# Allegro board BeagleBone_AI-64_Rev_B1_PCB_220602.brd
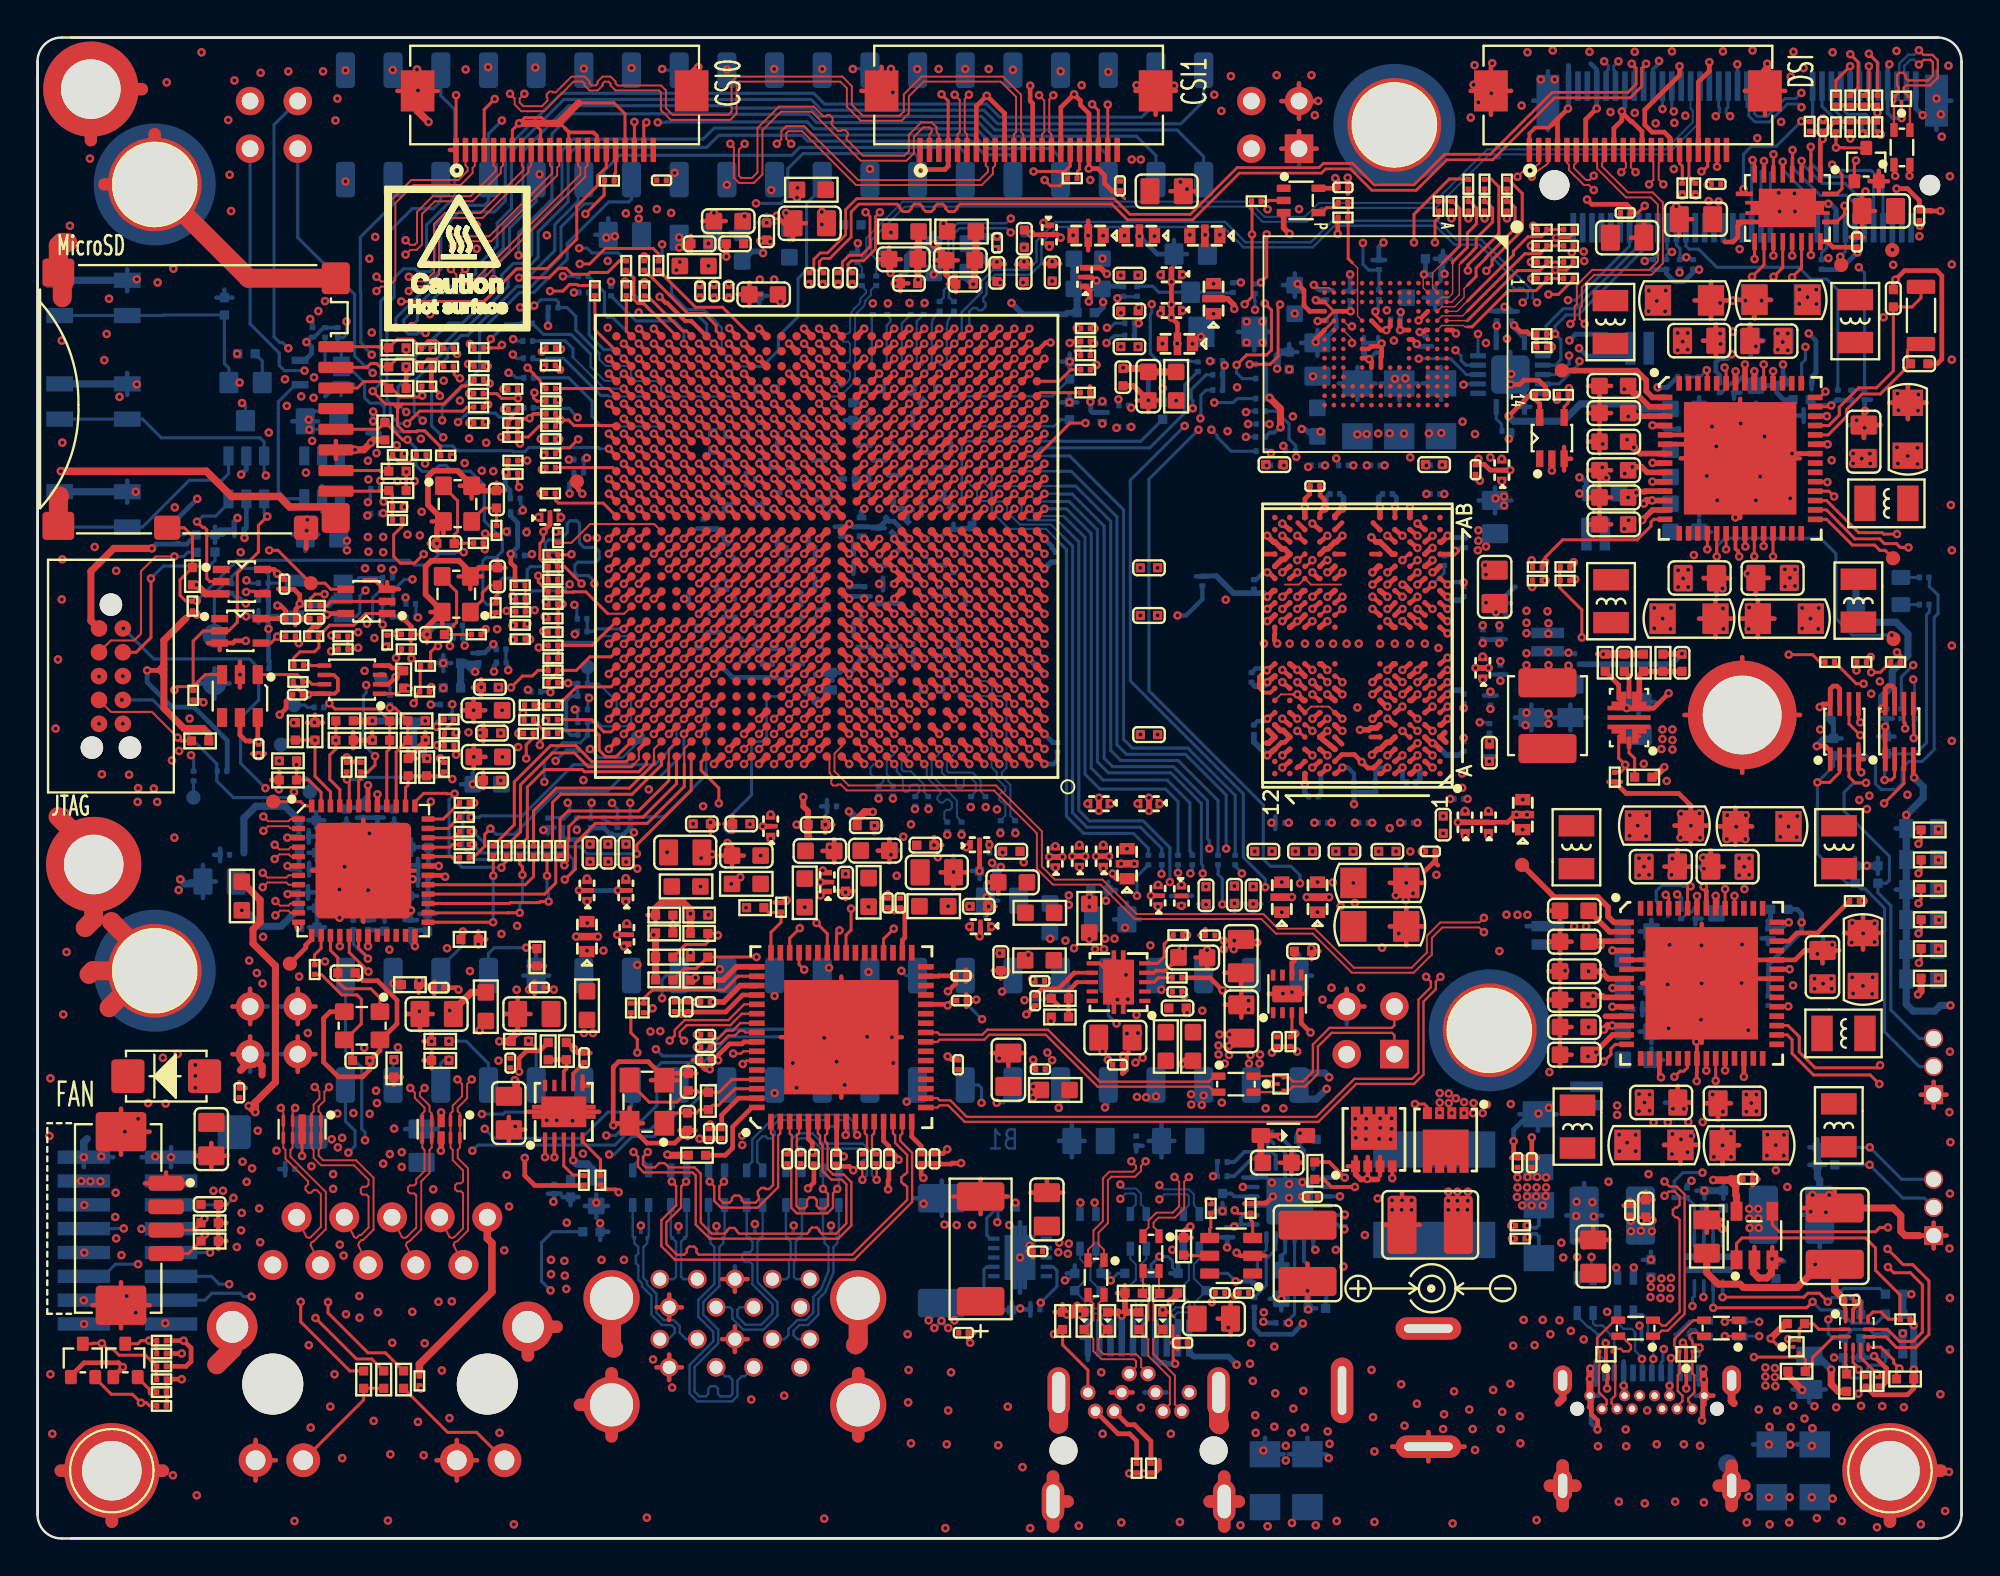
[diagram p0: board, top side]
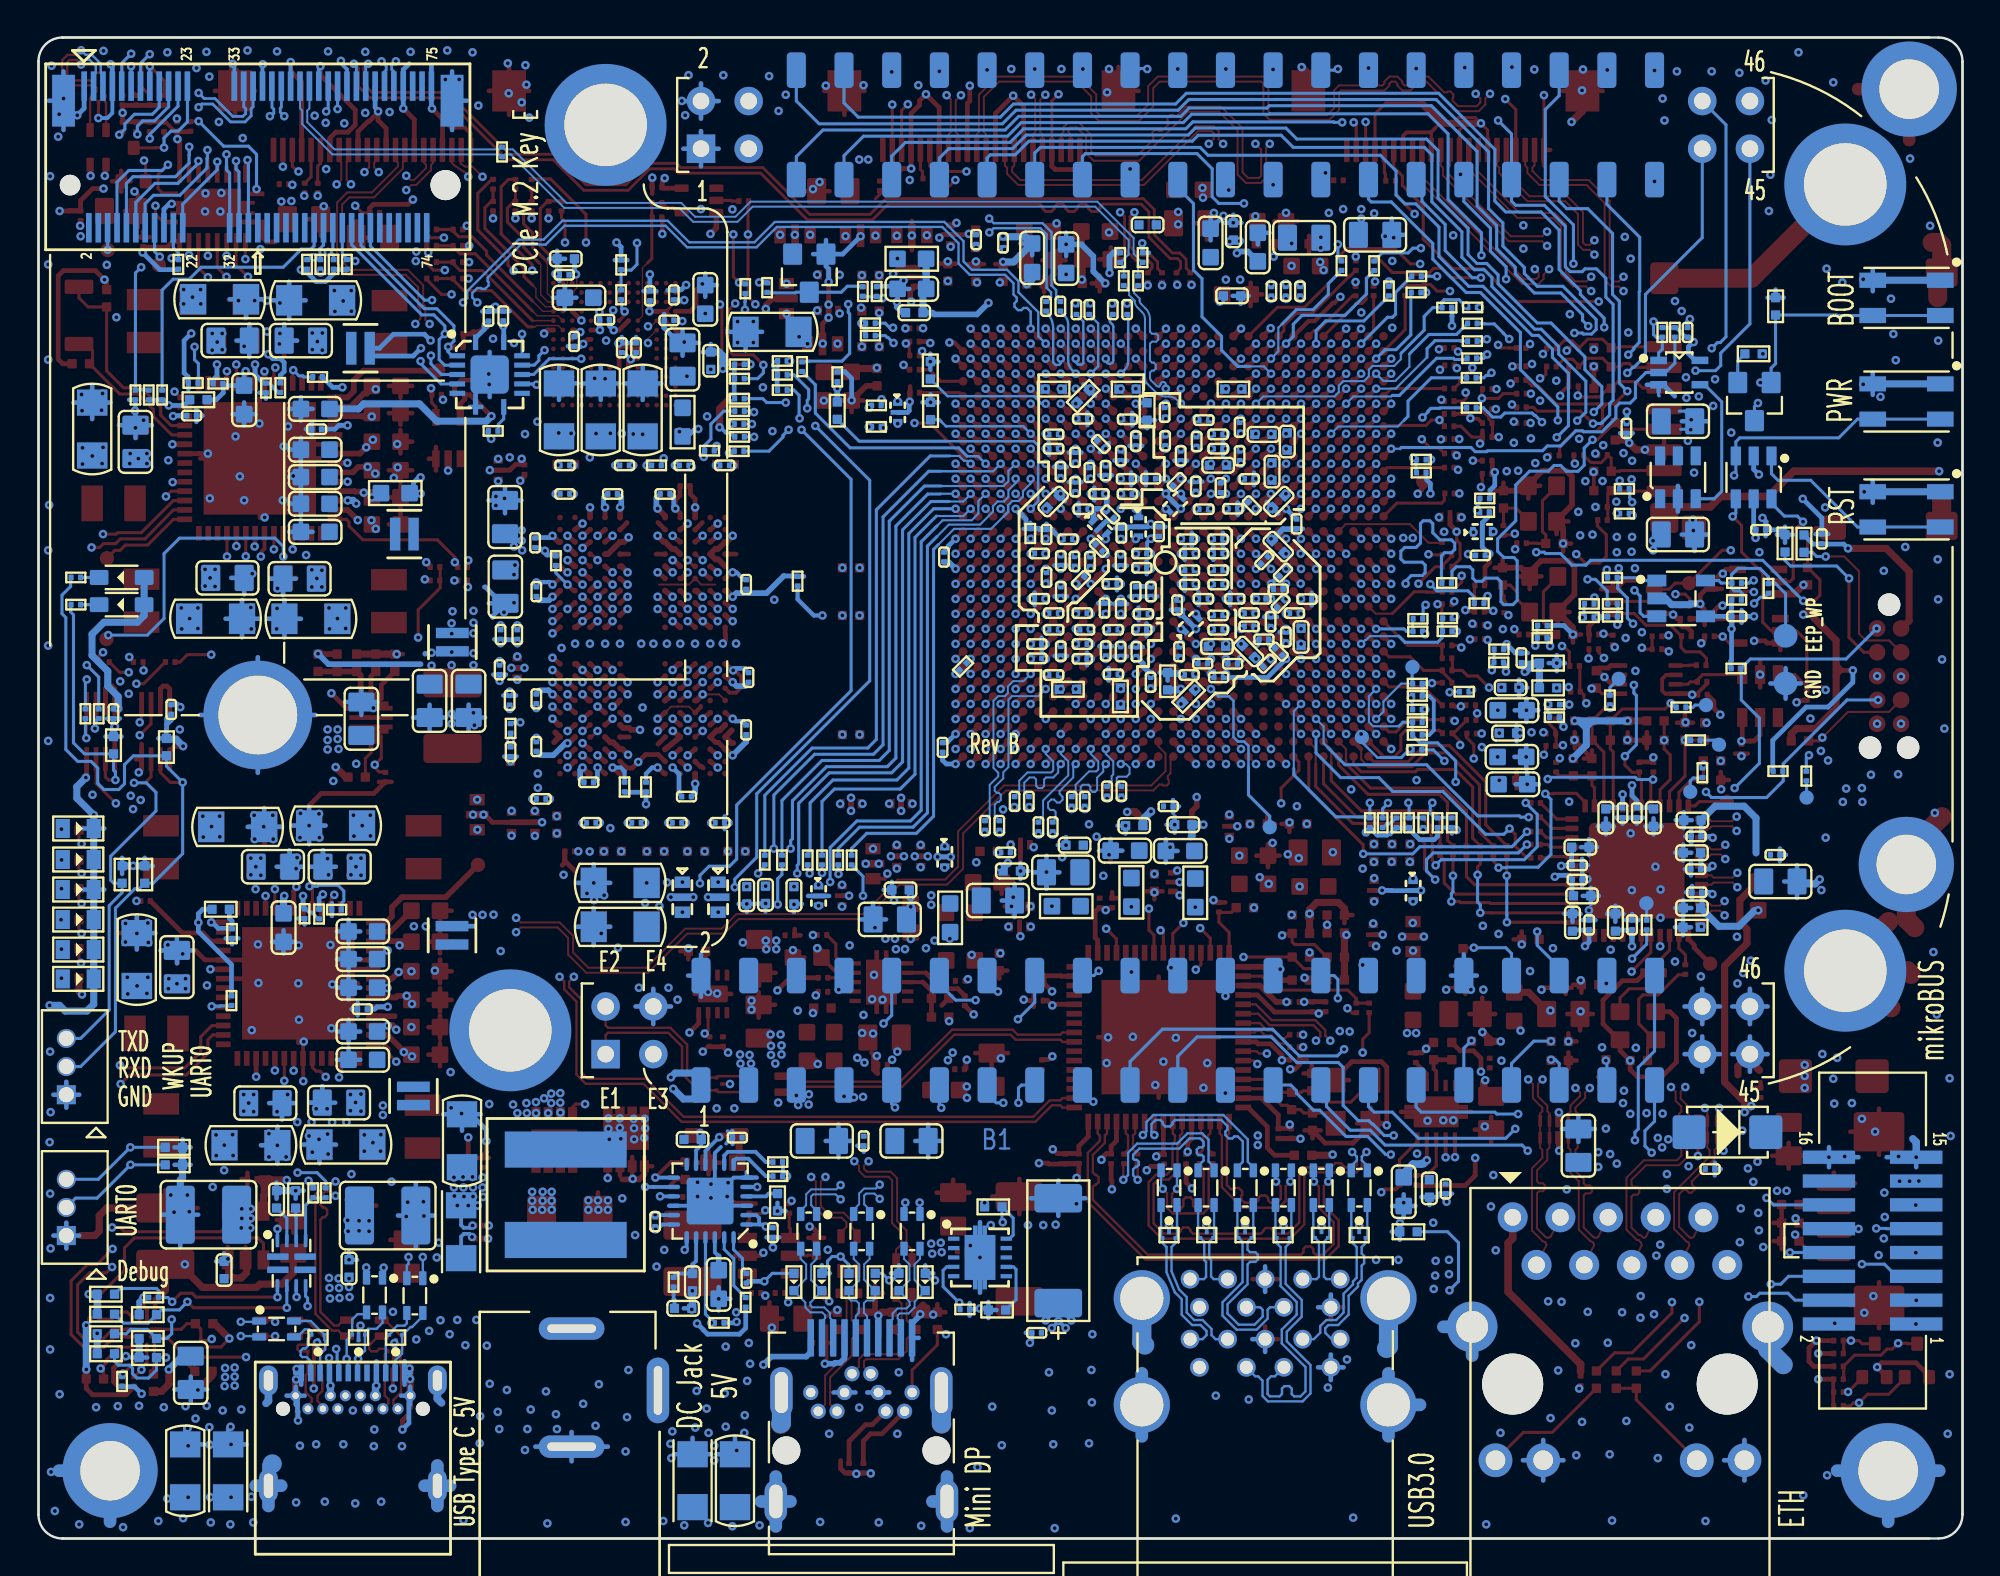
[diagram p1: board, bottom side, seen from below]

Outline 102.5 x 80 mm; copper layers: TOP, L2-GND, L3-SIGNAL, L4-GND, L5-SIGNAL, L6-GND, L7-PWR/GND, L8-PWR/GND, L9-PWR/GND, L10-SIGNAL, L11-GND, L12-SIGNAL, L13-GND, BOTTOM. Coordinates in mm from the lower left corner of the outline.
Outline path: 0,78.73 0,1.27 ; 0,78.73 arc(0.37,79.63) 1.27,80 ; 0,78.73 arc(0.37,79.63) 1.27,80 ; 0,78.73 0,1.27 ; 0,78.73 0,1.27 ; 0,1.27 arc(0.37,0.37) 1.27,0 ; 0,1.27 arc(0.37,0.37) 1.27,0 ; 1.27,80 101.23,80 ; 1.27,80 101.23,80 ; 101.23,80 1.77,80 ; 101.23,80 arc(102.12,79.63) 102.5,78.73 ; 101.23,80 arc(102.12,79.63) 102.5,78.73 ; 1.27,0 101.23,0 ; 1.27,0 101.23,0 ; 101.23,0 1.77,0 ; 101.23,0 arc(102.12,0.37) 102.5,1.27 ; 101.23,0 arc(102.12,0.37) 102.5,1.27 ; 102.5,78.73 102.5,1.27 ; 102.5,78.73 102.5,1.27 ; 102.5,78.73 102.5,1.27

## Design rules (mm)
constraint set DEFAULT: min track width 0.165
net group B_HUB_USB1_DM_DN2: nets B_USB1_DN1_D_N B_USB1_DN1_D_P
net group B_USBA2_SS_RX: nets B_USB1_SSRX_DN1_N B_USB1_SSRX_DN1_P
net group B_USBA2_SS_TX: nets B_USB1_SSTX_DN1_N B_USB1_SSTX_DN1_P
net group C_DP0_AUX: nets C_DP0_AUX_N C_DP0_AUX_P
net group C_DP0_TX0: nets C_DP0_TX0_N C_DP0_TX0_P
net group C_DP0_TX1: nets C_DP0_TX1_N C_DP0_TX1_P
net group C_DP0_TX2: nets C_DP0_TX2_N C_DP0_TX2_P
net group C_DP0_TX3: nets C_DP0_TX3_N C_DP0_TX3_P
net group C_PCIE1_TX0_N: nets C_PCIE1_TX0_N PCIE1_TX0_N
net group C_PCIE1_TX0_P: nets C_PCIE1_TX0_P PCIE1_TX0_P
net group C_PCIE1_TX1_N: nets C_PCIE1_TX1_N PCIE1_TX1_N
net group C_PCIE1_TX1_P: nets C_PCIE1_TX1_P PCIE1_TX1_P
net group C_USB1_SSTX_DN1_N: nets C_USB1_SSTX_DN1_N USB1_SSTX_DN1_N
net group C_USB1_SSTX_DN1_P: nets C_USB1_SSTX_DN1_P USB1_SSTX_DN1_P
net group C_USB1_SSTX_DN2_N: nets C_USB1_SSTX_DN2_N USB1_SSTX_DN2_N
net group C_USB1_SSTX_DN2_P: nets C_USB1_SSTX_DN2_P USB1_SSTX_DN2_P
net group C_USB_SS_TX1_N: nets C_USB_SS_TX1_N C_USB_SS_TX1_P
net group C_USB_SS_TX2: nets C_USB_SS_TX2_N C_USB_SS_TX2_P
net group C_USBA1_SS_TX: nets C_USBA_SS_TX_N C_USBA_SS_TX_P
net group C_USBA_SSRX_UP_N: nets C_USBA_SSRX_UP_N USBA_SS_RX_N
net group C_USBA_SSRX_UP_P: nets C_USBA_SSRX_UP_P USBA_SS_RX_P
net group CSI0_RX2: nets CSI0_RX2_N CSI0_RX2_P
net group CSI0_RX3: nets CSI0_RX3_N CSI0_RX3_P
net group DP0_AUX: nets DP0_AUX_N DP0_AUX_P
net group DP0_TX0: nets DP0_TX0_N DP0_TX0_P
net group DP0_TX1: nets DP0_TX1_N DP0_TX1_P
net group DP0_TX2: nets DP0_TX2_N DP0_TX2_P
net group DP0_TX3: nets DP0_TX3_N DP0_TX3_P
net group DP_CON_DP0_AUX: nets CON_DP0_AUX_N CON_DP0_AUX_P
net group DP_CON_DP0_TX0: nets CON_DP0_TX0_N CON_DP0_TX0_P
net group DP_CON_DP0_TX1: nets CON_DP0_TX1_N CON_DP0_TX1_P
net group DP_CON_DP0_TX2: nets CON_DP0_TX2_N CON_DP0_TX2_P
net group DP_CON_DP0_TX3: nets CON_DP0_TX3_N CON_DP0_TX3_P
net group EMMC_CLK: nets EMMC_CLK MMC0_CLK
net group EMMC_CMD: nets EMMC_CMD MMC0_CMD
net group EMMC_DAT0: nets EMMC_DAT0 MMC0_DAT0
net group EMMC_DAT1: nets EMMC_DAT1 MMC0_DAT1
net group EMMC_DAT2: nets EMMC_DAT2 MMC0_DAT2
net group EMMC_DAT3: nets EMMC_DAT3 MMC0_DAT3
net group EMMC_DAT4: nets EMMC_DAT4 MMC0_DAT4
net group EMMC_DAT5: nets EMMC_DAT5 MMC0_DAT5
net group EMMC_DAT6: nets EMMC_DAT6 MMC0_DAT6
net group EMMC_DAT7: nets EMMC_DAT7 MMC0_DAT7
net group EXP_HUB_USB1_DM_DN4: nets EXP_USB1_DN4_D_N EXP_USB1_DN4_D_P
net group M2_HUB_USB1_DP_DN3: nets M2_USB1_DN3_D_N M2_USB1_DN3_D_P
net group MCU_RGMII_RD0: nets MCU_RGMII_RD0 RX_D0
net group MCU_RGMII_RD1: nets MCU_RGMII_RD1 RX_D1
net group MCU_RGMII_RD2: nets MCU_RGMII_RD2 RX_D2
net group MCU_RGMII_RD3: nets MCU_RGMII_RD3 RX_D3
net group MCU_RGMII_RX_CTL: nets MCU_RGMII_RX_CTL RX_CTRL
net group MCU_RGMII_RXC: nets MCU_RGMII_RXC RX_CLK
net group MMC1_CLK: nets MMC1_CLK SD_CLK
net group MMC1_DAT0: nets MMC1_DAT0 SD_DAT0
net group MMC1_DAT1: nets MMC1_DAT1 SD_DAT1
net group MMC1_DAT2: nets MMC1_DAT2 SD_DAT2
net group MMC1_DAT3: nets MMC1_DAT3 SD_DAT3
net group MMC2_CLK: nets MMC2_CLK MMC2_CLK_R
net group PCIE1_REFCLK: nets PCIE1_REFCLK_N PCIE1_REFCLK_P
net group PCIE1_RX0: nets PCIE1_RX0_N PCIE1_RX0_P
net group PCIE1_RX1: nets PCIE1_RX1_N PCIE1_RX1_P
net group PHY_CLK_OUT_TP: nets PHY_CLK_OUT PHY_CLK_OUT_TP
net group PHY_GPIO0_TP: nets PHY_GPIO0 PHY_GPIO0_TP
net group PHY_GPIO1_TP: nets PHY_GPIO1 PHY_GPIO1_TP
net group PHY_LED0_TP: nets PHY_LED0 PHY_LED0_TP
net group PHY_LED1_TP: nets PHY_LED1 PHY_LED1_TP
net group PHY_LED2_TP: nets PHY_LED2 PHY_LED2_TP
net group PHY_TD_A: nets PHY_TD_A_M PHY_TD_A_P
net group PHY_TD_B: nets PHY_TD_B_M PHY_TD_B_P
net group PHY_TD_C: nets PHY_TD_C_M PHY_TD_C_P
net group PHY_TD_D: nets PHY_TD_D_M PHY_TD_D_P
net group SOC_SERDES1_REFCLK: nets SOC_SERDES1_REFCLK_N SOC_SERDES1_REFCLK_P
net group T_HUB_USB1_DM_DN1: nets T_USB1_DN2_D_N T_USB1_DN2_D_P
net group T_USBA1_SS_RX: nets T_USB1_SSRX_DN2_N T_USB1_SSRX_DN2_P
net group T_USBA1_SS_TX: nets T_USB1_SSTX_DN2_N T_USB1_SSTX_DN2_P
net group TX_CLK: nets MCU_RGMII_TXC TX_CLK
net group TX_CTRL: nets MCU_RGMII_TX_CTL TX_CTRL
net group TX_D0: nets MCU_RGMII_TD0 TX_D0
net group TX_D1: nets MCU_RGMII_TD1 TX_D1
net group TX_D2: nets MCU_RGMII_TD2 TX_D2
net group TX_D3: nets MCU_RGMII_TD3 TX_D3
net group USB0_DATA: nets USB0_DATA_N USB0_DATA_P
net group USB1_DN1_D_P: nets USB1_DN1_D_N USB1_DN1_D_P
net group USB1_DN2_D_N: nets USB1_DN2_D_N USB1_DN2_D_P
net group USB1_DN3_D_N: nets USB1_DN3_D_N USB1_DN3_D_P
net group USB1_DN4_D_N: nets USB1_DN4_D_N USB1_DN4_D_P
net group USB1_HUB_D: nets USB1_HUB_D_N USB1_HUB_D_P
net group USB1_SSRX_DN1_P: nets USB1_SSRX_DN1_N USB1_SSRX_DN1_P
net group USB1_SSRX_DN2_P: nets USB1_SSRX_DN2_N USB1_SSRX_DN2_P
net group USBA_SS_TX_P: nets USBA_SS_TX_N USBA_SS_TX_P
net group USBC_DATA_CONN_P: nets USBC_DATA_CONN_N USBC_DATA_CONN_P
net group USBC_SS_RX1_CONN_N: nets USBC_SS_RX1_CONN_N USBC_SS_RX1_CONN_P
net group USBC_SS_RX1_N: nets USBC_SS_RX1_N USBC_SS_RX1_P
net group USBC_SS_RX2: nets USBC_SS_RX2_N USBC_SS_RX2_P
net group USBC_SS_RX2_CONN_N: nets USBC_SS_RX2_CONN_N USBC_SS_RX2_CONN_P
net group USBC_SS_TX1_CONN_P: nets USBC_SS_TX1_CONN_N USBC_SS_TX1_CONN_P
net group USBC_SS_TX1_N: nets USBC_SS_TX1_N USBC_SS_TX1_P
net group USBC_SS_TX2: nets USBC_SS_TX2_N USBC_SS_TX2_P
net group USBC_SS_TX2_CONN_P: nets USBC_SS_TX2_CONN_N USBC_SS_TX2_CONN_P
net group CSI0_RX(SOC-MUX): nets CSI0_RX0_N CSI0_RX0_P CSI0_RX1_N CSI0_RX1_P CSI0_RXCLK_N CSI0_RXCLK_P
net group CSI1_RX: nets CSI1_RX0_N CSI1_RX0_P CSI1_RX1_N CSI1_RX1_P CSI1_RX2_N CSI1_RX2_P CSI1_RX3_N CSI1_RX3_P CSI1_RXCLK_N CSI1_RXCLK_P
net group DDR_ADD: nets LPDDR4_CA2 LPDDR4_CA3 LPDDR4_CA4 LPDDR4_CA5 LPDDR4_CK_T LPDDR4_CKE1 LPDDR4_CSN0_0 LPDDR4_CSN0_1 LPDDR4_CSN1_0 LPDDR4_CSN1_1
net group DDR_DATA0: nets LPDDR4_DM0_DBI0# LPDDR4_DQ0 LPDDR4_DQ1 LPDDR4_DQ2 LPDDR4_DQ3 LPDDR4_DQ4 LPDDR4_DQ5 LPDDR4_DQ6 LPDDR4_DQ7 LPDDR4_DQS0_N LPDDR4_DQS0_P
net group DDR_DATA1: nets LPDDR4_DM1_DBI1# LPDDR4_DQ8 LPDDR4_DQ9 LPDDR4_DQ10 LPDDR4_DQ11 LPDDR4_DQ12 LPDDR4_DQ13 LPDDR4_DQ14 LPDDR4_DQ15 LPDDR4_DQS1_N LPDDR4_DQS1_P
net group DDR_DATA2: nets LPDDR4_DM2_DBI2# LPDDR4_DQ16 LPDDR4_DQ17 LPDDR4_DQ18 LPDDR4_DQ19 LPDDR4_DQ20 LPDDR4_DQ21 LPDDR4_DQ22 LPDDR4_DQ23 LPDDR4_DQS2_N LPDDR4_DQS2_P
net group DDR_DATA3: nets LPDDR4_DM3_DBI3# LPDDR4_DQ24 LPDDR4_DQ25 LPDDR4_DQ26 LPDDR4_DQ27 LPDDR4_DQ28 LPDDR4_DQ29 LPDDR4_DQ30 LPDDR4_DQ31 LPDDR4_DQS3_N LPDDR4_DQS3_P
net group DSI_TX: nets DSI_TX0_N DSI_TX0_P DSI_TX1_N DSI_TX1_P DSI_TX2_N DSI_TX2_P DSI_TX3_N DSI_TX3_P DSI_TXCLK_N DSI_TXCLK_P
net group MG1_LCD: nets Y25_SYS_BOOTMODE3

## Placement (name value [footprint] x y rotation side)
C1  47uF  [C1206]  99.63 59.14 90 bottom
C2  10uF  [C0805]  97.33 58.45 90 bottom
C3  47uF  [C1206]  97.26 30.86 90 bottom
C4  100nF  [C0201]  33.93 28.34 90 top
C5  10uF  [C0805]  95.12 30.46 90 bottom
C6  1nF  [C1206]  94.68 3.6 90 bottom
C7  100nF  [C0201]  94.34 59.85 180 bottom
C8  100uF  [C1210]  93.44 17.26 0 bottom
C9  47uF  [C1206]  93.06 49.02 180 bottom
C10  47uF  [C1206]  92.84 66.06 180 bottom
C11  100nF  [C0402]  92.61 14.31 90 bottom
C12  10uF  [C0805]  92.43 51.2 180 bottom
C13  10uF  [C0805]  92.16 63.85 180 bottom
C14  47uF  [C1206]  91.89 37.93 180 bottom
C15  2.2uF  [C0603]  91.54 60.69 270 bottom
C16  47uF  [C1206]  91.18 20.96 180 bottom
C17  10uF  [C0805]  90.41 23.21 180 bottom
C18  10uF  [C0805]  90 35.81 180 bottom
C19  1uF  [C0402]  89.81 18.08 90 bottom
C20  2.2uF  [C0603]  89.44 32.56 270 bottom
C21  10uF  [C0805]  94.38 8.83 270 bottom
C22  10uF  [C0805]  88.59 51.16 0 bottom
C23  10uF  [C0805]  88.52 63.85 0 bottom
C24  47uF  [C1206]  87.98 49.02 0 bottom
C25  2.2uF  [C0603]  87.76 60.21 0 bottom
C26  2.2uF  [C0603]  87.76 58.03 0 bottom
C27  2.2uF  [C0603]  87.76 56.57 0 bottom
C28  2.2uF  [C0603]  87.76 55.15 0 bottom
C29  2.2uF  [C0603]  87.76 53.65 0 bottom
C30  47uF  [C1206]  87.73 66 0 bottom
C31  100nF  [C0201]  87.68 59.13 0 bottom
C32  47uF  [C1206]  86.67 38 0 bottom
C33  10uF  [C0805]  86.49 23.23 0 bottom
C34  10uF  [C0805]  86.45 35.81 0 bottom
C35  47uF  [C1206]  86.12 21 0 bottom
C36  100nF  [C0402]  85.95 14.39 90 bottom
C37  22uF  [C0805]  85.29 43.69 90 bottom
C38  100nF  [C0201]  85.24 28.22 0 bottom
C39  2.2uF  [C0603]  85.22 32.36 0 bottom
C40  2.2uF  [C0603]  85.22 30.88 0 bottom
C41  2.2uF  [C0603]  85.22 29.36 0 bottom
C42  2.2uF  [C0603]  85.22 27.02 0 bottom
C43  2.2uF  [C0603]  85.22 25.52 0 bottom
C44  100uF  [C1210]  83.89 17.21 180 bottom
C45  22uF  [C0805]  81.66 44.65 270 bottom
C46  47uF  [C1206]  79.93 21.2 90 bottom
C47  22uF  [C0805]  79.58 44.65 270 bottom
C48  100nF  [C0201]  78.52 65.15 90 bottom
C49  10nF  [C0201]  77.93 46.3 270 bottom
C50  10nF  [C0201]  77.88 48.18 270 bottom
C51  100nF  [C0201]  77.73 65.16 270 bottom
C52  10uF  [C0805]  77.64 54.44 90 bottom
C53  10uF  [C0805]  77.62 50.73 270 bottom
C54  100nF  [C0201]  77.4 44.68 90 bottom
C55  10nF  [C0201]  77.35 41.93 270 bottom
C56  10nF  [C0201]  76.99 48.18 270 bottom
C57  10nF  [C0201]  76.04 53.07 90 bottom
C58  10nF  [C0201]  75.97 50.47 270 bottom
C59  10nF  [C0201]  75.97 44.75 90 bottom
C60  10nF  [C0201]  75.97 42.21 270 bottom
C61  10nF  [C0201]  75.72 39.42 180 bottom
C62  47uF  [C1206]  74.76 60.16 90 bottom
C63  100nF  [C0201]  74.49 67.36 0 bottom
C64  100nF  [C0201]  74.45 57.2 180 bottom
C65  10nF  [C0201]  74.45 55.67 180 bottom
C66  1uF  [C0402]  74.4 68.21 0 bottom
C67  100nF  [C0201]  73.96 63.8 270 bottom
C68  2.2uF  [C0603]  73.7 66.14 0 bottom
C69  10nF  [C0201]  73.18 40.31 0 bottom
C70  10nF  [C0201]  73.05 38.15 180 bottom
C71  47uF  [C1206]  72.54 60.15 90 bottom
C72  100nF  [C0201]  72.34 64.96 180 bottom
C73  10nF  [C0201]  71.91 55.67 180 bottom
C74  47uF  [C1206]  71.51 34.95 0 bottom
C75  47uF  [C1206]  71.51 32.6 0 bottom
C76  100nF  [C0201]  71.42 63.47 90 bottom
C77  10nF  [C0201]  71.27 57.2 180 bottom
C78  100nF  [C0201]  70.66 63.47 90 bottom
C79  10nF  [C0201]  70.64 38.15 180 bottom
C80  47uF  [C1206]  70.31 60.15 90 bottom
C81  100nF  [C0201]  69.92 66.23 90 bottom
C82  10nF  [C0201]  69.12 55.67 0 bottom
C83  100nF  [C0201]  68.91 64.93 0 bottom
C84  100nF  [C0201]  68.65 66.28 90 bottom
C85  10nF  [C0201]  68.48 38.15 180 bottom
C86  10uF  [EMIFIL_0603_3P]  68.2 34.18 270 bottom
C87  22uF  [C0805]  68.18 62.84 90 bottom
C88  0.015uF  [C0402]  68.15 12.27 180 bottom
C89  10nF  [C0201]  68.1 57.2 180 bottom
C90  10nF  [C0201]  67.97 39.55 180 bottom
C91  330pF  [C0402]  67.66 13.66 270 bottom
C92  100nF  [C0402]  67.65 21.27 0 bottom
C93  2.2uF  [C0603]  66.97 66.04 90 bottom
C94  1uF  [C0402]  66.68 62.77 90 bottom
C95  10uF  [EMIFIL_0603_3P]  66.29 34.18 270 bottom
C96  120nF  [C0603]  66.26 13.54 270 bottom
C97  10nF  [C0201]  66.19 38.15 180 bottom
C98  10nF  [C0201]  65.94 57.2 180 bottom
C99  10nF  [C0201]  64.8 50.85 270 bottom
C100  10nF  [C0201]  64.8 43.1 270 bottom
C101  220nF  [C0201]  64.78 13.87 270 bottom
C102  470nF  [C0402]  64.77 34.28 270 bottom
C103  10nF  [C0201]  64.67 45.9 270 bottom
C104  470nF  [C0402]  63.77 34.31 270 bottom
C105  47uF  [C1206]  63.41 64.31 0 bottom
C106  100nF  [C0201]  63.37 16.31 90 bottom
C107  470nF  [C0402]  62.25 34.28 270 bottom
C108  1uF  [EMIFIL_0402_3P]  60.94 34.25 270 bottom
C109  22uF  [C0805]  57.14 33 0 bottom
C110  1uF  [EMIFIL_0402_3P]  56.72 60.02 270 bottom
C111  100nF  [C0201]  42.31 39.02 180 bottom
C112  1uF  [C0402]  56.57 34.57 0 bottom
C113  4.7uF  [C0603]  55.97 66.6 0 bottom
C114  1uF  [C0402]  55.84 65.33 0 bottom
C115  100nF  [C0201]  54.33 42.16 90 bottom
C116  100nF  [C0201]  54.26 52.31 270 bottom
C117  1uF  [EMIFIL_0402_3P]  54.22 36.33 270 bottom
C118  100nF  [C0201]  52.55 69.23 90 bottom
C119  220nF  [C0201]  52.07 38 270 bottom
C120  22uF  [C0805]  51.38 34 180 bottom
C121  220nF  [C0201]  51.31 38 270 bottom
C122  100nF  [C0201]  51.11 69.06 90 bottom
C123  100nF  [C0201]  50.98 36.57 0 bottom
C124  1uF  [C0402]  50.65 35.58 180 bottom
C125  220nF  [C0201]  50.5 39.29 270 bottom
C126  220nF  [C0201]  49.73 39.29 270 bottom
C127  100nF  [C0201]  49.3 47.67 180 bottom
C128  100nF  [C0201]  49.3 46.91 0 bottom
C129  220nF  [C0201]  49.23 37.93 270 bottom
C130  100nF  [C0201]  49.18 52.5 180 bottom
C131  100nF  [C0201]  49.18 50.09 0 bottom
C132  220nF  [C0201]  48.82 65.68 90 bottom
C133  100nF  [C0201]  48.8 53.52 90 bottom
C134  100nF  [C0201]  48.8 51.23 270 bottom
C135  220nF  [C0201]  48.46 37.93 270 bottom
C136  1uF  [C0402]  48.44 55.27 135 bottom
C137  100nF  [C0201]  48.41 58.85 180 bottom
C138  100nF  [C0201]  48.41 58.09 0 bottom
C139  100nF  [C0201]  48.41 49.32 0 bottom
C140  100nF  [C0201]  48.41 48.44 180 bottom
C141  100nF  [C0201]  48.41 46.02 0 bottom
C142  150uF  [AVX_C]  48.17 15.34 90 bottom
C143  220nF  [C0201]  48.06 65.68 90 bottom
C144  100nF  [C0201]  48.05 56.86 90 bottom
C145  100nF  [C0201]  48.03 52.12 270 bottom
C146  100nF  [C0201]  48.03 50.47 270 bottom
C147  100nF  [C0201]  48.03 47.29 270 bottom
C148  22uF  [C0805]  47.91 35.51 0 bottom
C149  4.7uF  [C0603]  47.75 68.22 90 bottom
C150  100nF  [C0201]  47.65 53.26 0 bottom
C151  220nF  [C0201]  47.45 39.29 270 bottom
C152  100nF  [C0201]  47.31 52.08 90 bottom
C153  1uF  [C0402]  47.3 36.95 0 bottom
C154  100nF  [C0201]  47.27 57.63 90 bottom
C155  100nF  [C0201]  47.27 56.06 90 bottom
C156  100nF  [C0201]  46.96 51.08 135 bottom
C157  100nF  [C0201]  49.32 10.96 0 bottom
C158  100nF  [C0201]  46.89 49.32 0 bottom
C159  100nF  [C0201]  46.89 47.67 0 bottom
C160  100nF  [C0201]  46.89 46.89 180 bottom
C161  100nF  [C0201]  46.87 59.68 180 bottom
C162  100nF  [C0201]  46.84 54.86 0 bottom
C163  100nF  [C0201]  46.76 48.44 180 bottom
C164  220nF  [C0201]  46.76 39.29 270 bottom
C165  100nF  [C0201]  46.51 56.82 90 bottom
C166  100nF  [C0201]  46.48 52.07 270 bottom
C167  100nF  [C0201]  46 55.67 0 bottom
C168  100nF  [C0201]  46 52.8 45 bottom
C169  1uF  [EMIFIL_0402_3P]  45.95 53.9 225 bottom
C170  100nF  [C0201]  45.9 58.33 225 bottom
C171  100nF  [C0201]  45.71 49.59 90 bottom
C172  100nF  [C0201]  45.65 56.92 270 bottom
C173  100nF  [C0201]  45.64 47.3 90 bottom
C174  220nF  [C0201]  45.57 39.83 270 bottom
C175  100nF  [C0201]  45.39 54.58 225 bottom
C176  100nF  [C0201]  45.29 50.88 180 bottom
C177  220nF  [C0201]  45.26 65.5 90 bottom
C178  100nF  [C0201]  45.24 48.44 180 bottom
C179  100nF  [C0201]  45.23 46.06 0 bottom
C180  100nF  [C0201]  44.85 52.11 270 bottom
C181  100nF  [C0201]  44.85 47.28 270 bottom
C182  100nF  [C0201]  44.84 49.56 90 bottom
C183  100nF  [C0201]  44.84 57.71 270 bottom
C184  100nF  [C0201]  44.81 53.59 90 bottom
C185  220nF  [C0201]  44.81 39.83 270 bottom
C186  4.7uF  [C0603]  44.62 36.66 0 bottom
C187  100nF  [C0201]  44.54 56.48 180 bottom
C188  220nF  [C0201]  44.5 65.5 90 bottom
C189  100nF  [C0201]  44.49 55.67 0 bottom
C190  100nF  [C0201]  44.48 59.65 180 bottom
C191  1uF  [C0402]  44.12 38 0 bottom
C192  100nF  [C0201]  44.05 50.47 270 bottom
C193  100nF  [C0201]  44.04 58.49 270 bottom
C194  100nF  [C0201]  44.01 47.27 90 bottom
C195  1uF  [EMIFIL_0402_3P]  43.89 53.92 270 bottom
C196  100nF  [C0201]  43.72 52.5 0 bottom
C197  100nF  [C0201]  43.72 51.74 180 bottom
C198  100nF  [C0201]  43.72 48.44 180 bottom
C199  100nF  [C0201]  43.64 49.28 0 bottom
C200  1uF  [C0402]  43.41 70.02 0 bottom
C201  100nF  [C0201]  43.25 45.64 270 bottom
C202  100nF  [C0201]  43.25 56.49 0 bottom
C203  100nF  [C0201]  43.23 50.47 270 bottom
C204  100nF  [C0201]  42.8 53.67 90 bottom
C205  100nF  [C0201]  42.5 60.03 90 bottom
C206  100nF  [C0201]  42.48 58.51 270 bottom
C207  1uF  [EMIFIL_0402_3P]  41.94 55.14 135 bottom
C208  100nF  [C0201]  41.86 56.31 315 bottom
C209  100nF  [C0201]  41.84 49.76 270 bottom
C210  100nF  [C0201]  41.73 47.27 90 bottom
C211  4.7uF  [C0603]  41.68 36.65 0 bottom
C212  100nF  [C0201]  41.65 57.7 270 bottom
C213  1uF  [C0402]  41.51 38.05 0 bottom
C214  100nF  [C0201]  41.3 53.26 180 bottom
C215  100nF  [C0201]  41.2 46.03 0 bottom
C216  100nF  [C0201]  41.18 52.5 0 bottom
C217  100nF  [C0201]  41.18 51.61 180 bottom
C218  100nF  [C0201]  41.18 50.85 0 bottom
C219  1uF  [EMIFIL_0402_3P]  41.1 48.74 135 bottom
C220  100nF  [C0201]  40.84 56.08 90 bottom
C221  100nF  [C0201]  40.79 58.47 270 bottom
C222  100nF  [C0201]  40.48 46.63 0 bottom
C223  100nF  [C0201]  40.44 50.09 0 bottom
C224  100nF  [C0201]  40.41 59.61 0 bottom
C225  100nF  [C0201]  40.41 54.86 180 bottom
C226  4.7uF  [C0603]  40.05 69.05 90 bottom
C227  1uF  [C0402]  39.72 47.55 0 bottom
C228  100nF  [C0201]  39.65 58.85 0 bottom
C229  100nF  [C0201]  39.65 58.09 180 bottom
C230  1uF  [C0402]  39.65 57.2 0 bottom
C231  100nF  [C0201]  39.65 53.26 180 bottom
C232  100nF  [C0201]  39.65 52.5 0 bottom
C233  100nF  [C0201]  39.65 51.61 180 bottom
C234  100nF  [C0201]  39.65 50.85 0 bottom
C235  100nF  [C0201]  39.65 49.2 0 bottom
C236  100nF  [C0201]  39.65 48.44 180 bottom
C237  100nF  [C0201]  39.63 45.9 0 bottom
C238  4.7uF  [C0603]  49.56 68.26 90 bottom
C239  100nF  [C0201]  39.52 56 270 bottom
C240  1uF  [C0402]  38.91 66.23 180 bottom
C241  100nF  [C0201]  38.88 46.62 0 bottom
C242  100nF  [C0201]  38.86 54.89 180 bottom
C243  1uF  [C0402]  38.84 69.67 90 bottom
C244  100nF  [C0201]  38.76 50.09 0 bottom
C245  100nF  [C0201]  38.51 59.23 270 bottom
C246  100nF  [C0201]  38.51 57.71 270 bottom
C247  100nF  [C0201]  36.45 21.58 270 top
C248  1uF  [C0402]  38.03 47.28 225 bottom
C249  100nF  [C0201]  38 48.62 180 bottom
C250  1uF  [EMIFIL_0402_3P]  29.27 34.53 270 bottom
C251  100nF  [C0201]  38 49.32 0 bottom
C252  100nF  [C0201]  38 56.47 180 bottom
C253  100nF  [C0201]  37.85 55.06 45 bottom
C254  4.7uF  [C0603]  37.54 68.83 90 bottom
C255  100nF  [C0201]  37.37 50.09 0 bottom
C256  1uF  [C0402]  37.24 58.85 0 bottom
C257  100nF  [C0201]  37.21 47.93 180 bottom
C258  100nF  [C0201]  37.19 52.14 315 bottom
C259  100nF  [C0201]  37.06 46.63 315 bottom
C260  100nF  [C0201]  36.86 48.87 90 bottom
C261  100nF  [C0201]  36.82 66.48 90 bottom
C262  1uF  [C0402]  36.78 56.87 90 bottom
C263  1uF  [C0402]  36.45 52.87 45 bottom
C264  100nF  [C0201]  36.45 50.59 0 bottom
C265  100nF  [C0201]  36.43 47.27 45 bottom
C266  1uF  [C0402]  36.43 55.27 315 bottom
C267  100nF  [C0201]  36.32 49.83 315 bottom
C268  100nF  [C0201]  36.2 51.48 315 bottom
C269  100nF  [C0201]  36.05 66.48 90 bottom
C270  100nF  [C0201]  36.04 48.05 90 bottom
C271  1uF  [C0402]  35.97 58.47 90 bottom
C272  100nF  [C0201]  35.59 49.32 180 bottom
C273  100nF  [C0201]  35.47 54.08 270 bottom
C274  100nF  [C0201]  35.29 66.48 90 bottom
C275  1uF  [C0402]  35.23 48.05 270 bottom
C276  22uF  [C0805]  35.07 69.33 180 bottom
C277  100nF  [C0201]  34.92 50.07 180 bottom
C278  10uF  [C0805]  31.29 69.49 180 bottom
C279  100nF  [C0201]  25.68 52.4 180 bottom
C280  1uF  [EMIFIL_0402_3P]  25.58 53.67 180 bottom
C281  1uF  [C0402]  24.21 42.93 180 bottom
C282  1uF  [C0402]  24.07 45.34 180 bottom
C283  4.7uF  [C0603]  24 41.66 180 bottom
C284  4.7uF  [C0603]  23.99 44.15 180 bottom
C285  4.7uF  [C0603]  23.95 40.2 180 bottom
C286  100nF  [C0201]  23.5 46.94 90 bottom
C287  1uF  [C0402]  20.78 32.83 90 bottom
C288  100nF  [C0201]  20.52 35.88 180 bottom
C289  100nF  [C0201]  20.52 35.12 180 bottom
C290  1uF  [C0402]  20.36 36.85 180 bottom
C291  1uF  [C0402]  20.26 34.25 180 bottom
C292  100nF  [C0201]  19.89 32.71 90 bottom
C293  1uF  [C0402]  19 38.42 270 bottom
C294  1uF  [C0402]  18.49 32.83 90 bottom
C295  100nF  [C0201]  18.11 38.68 270 bottom
C296  100nF  [C0201]  17.9 59.17 270 bottom
C297  100nF  [C0201]  17.6 32.71 90 bottom
C298  100nF  [C0201]  17.35 38.68 270 bottom
C299  1uF  [C0402]  16.46 38.42 270 bottom
C300  22uF  [C0805]  15.16 53.51 180 bottom
C301  22uF  [C0805]  15.15 59.55 180 bottom
C302  100nF  [C0201]  14.64 64.29 90 bottom
C303  1uF  [C0402]  14.41 36.55 0 bottom
C304  1uF  [C0402]  14.41 33.6 0 bottom
C305  1uF  [C0402]  14.38 38.29 0 bottom
C306  100nF  [C0201]  14.21 35.68 0 bottom
C307  100nF  [C0201]  14.19 37.42 0 bottom
C308  100nF  [C0201]  14.15 34.44 0 bottom
C309  100nF  [C0201]  12.02 49.15 180 bottom
C310  100nF  [C0201]  10.74 53.76 180 bottom
C311  10nF  [C0201]  9.98 36.44 180 bottom
C312  10uF  [C0805]  9.7 35.02 180 bottom
C313  100nF  [C0201]  7.49 53.28 90 bottom
C314  1uF  [C0402]  28.4 18.66 270 bottom
C315  10uF  [C0805]  25.11 22.68 270 top
C316  100nF  [C0201]  11.77 42.08 270 top
C317  100nF  [C0201]  13.16 50.87 270 top
C318  100nF  [C0201]  13.48 49.02 0 top
C319  100nF  [C0201]  13.85 44.97 180 top
C320  100nF  [C0201]  14.77 49.02 180 top
C321  27pF  [C0402]  16.46 30.15 0 top
C322  27pF  [C0402]  17.24 25.47 0 top
C323  100nF  [C0201]  45.3 33.88 90 top
C324  100nF  [C0201]  47.79 20.23 270 top
C325  12pF  [C0402]  21.21 48.18 180 top
C326  10uF  [C0805]  21.26 27.96 180 top
C327  10nF  [C0201]  21.39 29.36 180 top
C328  10pF  [C0402]  21.74 53.03 180 top
C329  4.7uF  [C0603]  23.99 44.15 180 top
C330  4.7uF  [C0603]  24 41.66 180 top
C331  1uF  [C0402]  24.1 45.37 180 top
C332  1uF  [C0402]  24.21 42.93 180 top
C333  1uF  [C0402]  24.21 40.41 180 top
C334  10pF  [C0402]  24.45 55.38 90 top
C335  12pF  [C0402]  24.5 51.28 90 top
C336  10uF  [C0805]  26.47 27.96 180 top
C337  10nF  [C0201]  26.73 29.37 180 top
C338  1uF  [EMIFIL_0402_3P]  27.3 54.43 0 top
C339  10uF  [C0805]  57.42 26.7 0 top
C340  1uF  [EMIFIL_0402_3P]  29.27 34.54 90 top
C341  10uF  [EMIFIL_0603_3P]  29.27 32.08 90 top
C342  100nF  [C0201]  27.53 18.63 270 bottom
C343  470nF  [C0402]  29.44 36.55 270 top
C344  470nF  [C0402]  30.39 36.55 270 top
C345  1uF  [EMIFIL_0402_3P]  31.34 34.54 90 top
C346  470nF  [C0402]  31.35 36.55 270 top
C347  1uF  [EMIFIL_0402_3P]  31.39 32.18 90 top
C348  100nF  [C0201]  33.24 72.39 0 top
C349  22uF  [C0805]  34.5 36.57 0 top
C350  27pF  [C0402]  34.62 22.21 90 top
C351  27pF  [C0402]  34.67 24.33 270 top
C352  1uF  [C0402]  35.27 69.01 180 top
C353  100nF  [C0201]  35.29 66.48 90 top
C354  1uF  [C0402]  35.39 38.09 0 top
C355  100nF  [C0201]  35.58 28.6 180 top
C356  100nF  [C0201]  34.63 28.34 90 top
C357  100nF  [C0201]  35.58 25.52 180 top
C358  100nF  [C0201]  35.76 21.59 270 top
C359  100nF  [C0201]  36.05 66.48 90 top
C360  4.7uF  [C0603]  36.8 70.22 180 top
C361  100nF  [C0201]  36.82 66.48 90 top
C362  1uF  [C0402]  37.15 69.01 180 top
C363  1uF  [C0402]  37.49 38.09 180 top
C364  4.7uF  [C0603]  37.76 36.4 180 top
C365  4.7uF  [C0603]  38.68 66.31 180 top
C366  1uF  [C0402]  38.84 69.67 90 top
C367  1uF  [EMIFIL_0402_3P]  39.05 37.96 90 top
C368  220nF  [C0201]  41.13 67.21 90 top
C369  22uF  [C0805]  41.14 70.1 180 top
C370  1uF  [C0402]  41.51 38.05 0 top
C371  100nF  [C0201]  41.36 20.22 270 top
C372  4.7uF  [C0603]  41.68 36.65 0 top
C373  220nF  [C0201]  41.87 67.21 90 top
C374  1uF  [EMIFIL_0402_3P]  42.07 34.99 90 top
C375  220nF  [C0201]  42.64 67.21 90 top
C376  470nF  [C0402]  43.05 34.96 270 top
C377  220nF  [C0201]  43.4 67.21 90 top
C378  1uF  [C0402]  44.12 38 0 top
C379  4.7uF  [C0603]  44.62 36.66 0 top
C380  100nF  [C0201]  42.54 20.21 270 top
C381  100nF  [C0201]  45.96 33.88 90 top
C382  4.7uF  [C0603]  46.13 68.18 180 top
C383  1uF  [C0402]  46.43 66.9 180 top
C384  100nF  [C0201]  49.32 10.96 0 top
C385  100nF  [C0201]  47.07 20.24 270 top
C386  1uF  [C0402]  47.3 36.95 0 top
C387  22uF  [C0805]  47.91 35.51 0 top
C388  150uF  [AVX_C]  50.24 15.43 90 top
C389  4.7uF  [C0603]  49.16 68.13 180 top
C390  1uF  [C0402]  49.38 66.86 180 top
C391  470nF  [C0402]  50.14 33.69 0 top
C392  1uF  [EMIFIL_0402_3P]  50.18 36.98 0 top
C393  1uF  [EMIFIL_0402_3P]  50.23 32.61 180 top
C394  100nF  [C0201]  49.04 25.25 90 top
C395  470nF  [C0402]  51.11 67.46 90 top
C396  100nF  [C0201]  51.12 69.06 90 top
C397  100nF  [C0201]  49.2 29.99 0 top
C398  100nF  [C0201]  49.22 28.67 0 top
C399  1uF  [C0402]  51.31 30.73 270 top
C400  1uF  [C0402]  51.88 36.62 180 top
C401  4.7uF  [C0603]  51.95 34.97 180 top
C402  100nF  [C0201]  45.35 20.23 270 top
C403  470nF  [C0402]  52.55 67.46 90 top
C404  470nF  [C0402]  52.57 69.28 90 top
C405  10uF  [C0805]  53.77 17.54 90 top
C406  100nF  [C0402]  9.17 17.8 0 top
C407  10uF  [C0805]  51.72 24.98 90 top
C408  100nF  [C0201]  53.29 15.31 180 top
C409  100nF  [C0201]  53.39 29.72 180 top
C410  1uF  [EMIFIL_0402_3P]  53.9 69.5 270 top
C411  470nF  [C0402]  54.05 67.49 90 top
C412  1uF  [EMIFIL_0402_3P]  54.22 36.33 90 top
C413  1uF  [EMIFIL_0402_3P]  55.5 36.36 90 top
C414  100nF  [C0201]  53.43 25.02 180 top
C415  1uF  [EMIFIL_0402_3P]  55.78 67.23 90 top
C416  10uF  [EMIFIL_0603_3P]  55.97 69.45 180 top
C417  1uF  [EMIFIL_0402_3P]  56.54 39.16 180 top
C418  1uF  [EMIFIL_0402_3P]  56.77 36.36 90 top
C419  100nF  [C0201]  57.67 72.1 270 top
C420  1uF  [C0402]  57.82 61.9 270 top
C421  4.7uF  [C0603]  29.77 18.48 270 bottom
C422  10uF  [EMIFIL_0603_3P]  58.04 35.96 90 top
C423  470nF  [C0402]  58.17 67.33 0 top
C424  470nF  [C0402]  58.17 65.43 0 top
C425  470nF  [C0402]  58.17 63.52 0 top
C426  10uF  [EMIFIL_0603_3P]  58.7 69.44 180 top
C427  4.7uF  [C0603]  59.18 61.42 270 top
C428  470nF  [C0402]  59.21 51.74 0 top
C429  470nF  [C0402]  59.21 49.2 0 top
C430  470nF  [C0402]  59.21 42.85 0 top
C431  1uF  [EMIFIL_0402_3P]  59.21 39.16 180 top
C432  1uF  [EMIFIL_0402_3P]  59.69 34.26 90 top
C433  100nF  [C0201]  25.18 25.34 90 top
C434  10uF  [C0805]  60.15 71.81 0 top
C435  1uF  [EMIFIL_0402_3P]  60.4 67.36 180 top
C436  1uF  [EMIFIL_0402_3P]  60.4 65.45 180 top
C437  10uF  [EMIFIL_0603_3P]  60.73 63.68 180 top
C438  1uF  [EMIFIL_0402_3P]  60.94 34.25 270 top
C439  100nF  [C0201]  62.47 32.15 180 top
C440  100nF  [C0201]  61 10.43 180 top
C441  10uF  [EMIFIL_0603_3P]  62.19 69.43 180 top
C442  470nF  [C0402]  62.25 34.29 270 top
C443  10uF  [C0805]  62.67 11.72 0 top
C444  10uF  [EMIFIL_0603_3P]  62.65 66.09 90 top
C445  100nF  [C0201]  62.99 13.08 0 top
C446  22uF  [C0805]  64.11 31.04 270 top
C447  22uF  [C0805]  64.13 27.56 90 top
C448  470nF  [C0402]  63.76 34.31 270 top
C449  100nF  [C0201]  64.26 13.08 180 top
C450  470nF  [C0402]  64.76 34.29 270 top
C451  470nF  [C0402]  65.31 36.62 0 top
C452  470nF  [C0402]  65.89 57.24 180 top
C453  2.2uF  [C0603]  66.04 20.03 0 top
C454  10uF  [EMIFIL_0603_3P]  66.29 34.18 90 top
C455  220pF  [C0402]  67.41 31.3 0 top
C456  100nF  [C0201]  66.03 26.48 270 top
C457  470nF  [C0402]  67.46 36.62 0 top
C458  100uF  [C1210]  67.66 15.2 270 top
C459  100nF  [C0201]  67.92 18.2 180 top
C460  10nF  [C0201]  68.05 56.1 180 top
C461  10uF  [EMIFIL_0603_3P]  68.19 34.18 90 top
C462  100nF  [C0201]  69.54 72.02 0 top
C463  1uF  [C0402]  69.62 36.62 0 top
C464  47uF  [C1206]  71.51 34.94 0 top
C465  47uF  [C1206]  71.51 32.63 0 top
C466  470nF  [C0402]  71.91 36.62 0 top
C467  100uF  [C1210]  74.19 16.72 180 top
C468  10nF  [C0201]  74.2 36.62 0 top
C469  470nF  [C0402]  74.4 57.24 180 top
C470  470nF  [C0402]  74.88 38.05 270 top
C471  1uF  [EMIFIL_0402_3P]  76.05 38.17 90 top
C472  100nF  [C0201]  76.61 56.97 90 top
C473  1uF  [EMIFIL_0402_3P]  76.99 46.4 90 top
C474  1uF  [EMIFIL_0402_3P]  77.29 38.17 90 top
C475  470nF  [C0402]  77.35 41.88 270 top
C476  10uF  [C0805]  77.62 50.72 270 top
C477  1uF  [EMIFIL_0402_3P]  78.01 56.94 90 top
C478  100nF  [C0201]  78.84 20.03 90 top
C479  10uF  [EMIFIL_0603_3P]  79.12 38.58 90 top
C480  100nF  [C0201]  79.6 20.03 90 top
C481  100nF  [C0201]  80.06 60.96 0 top
C482  2.2uF  [C0603]  81.87 33.46 180 top
C483  2.2uF  [C0603]  81.87 31.81 180 top
C484  2.2uF  [C0603]  81.87 30.23 180 top
C485  2.2uF  [C0603]  81.87 28.71 180 top
C486  2.2uF  [C0603]  81.87 27.26 180 top
C487  2.2uF  [C0603]  81.87 25.79 180 top
C488  10uF  [C0805]  82.88 15.03 90 top
C489  2.2uF  [C0603]  83.97 61.43 180 top
C490  2.2uF  [C0603]  83.97 59.98 180 top
C491  2.2uF  [C0603]  83.97 58.46 180 top
C492  2.2uF  [C0603]  83.97 56.94 180 top
C493  2.2uF  [C0603]  83.97 55.49 180 top
C494  2.2uF  [C0603]  83.97 54.05 180 top
C495  4.7nF  [C0402]  84.53 46.68 90 top
C496  100nF  [C0201]  84.58 70.65 0 top
C497  10uF  [C0805]  84.68 69.33 0 top
C498  10nF  [C0201]  84.83 17.49 90 top
C499  1uF  [C0402]  85.67 17.59 90 top
C500  47uF  [C1206]  86.11 20.97 0 top
C501  10uF  [C0805]  86.48 35.81 0 top
C502  10uF  [C0805]  86.49 23.24 0 top
C503  47uF  [C1206]  86.67 38 0 top
C504  10pF  [C0402]  87.6 46.68 270 top
C505  47uF  [C1206]  87.74 65.99 0 top
C506  47uF  [C1206]  87.98 49.03 0 top
C507  10uF  [C0805]  88.35 70.32 180 top
C508  10uF  [C0805]  88.52 63.85 0 top
C509  10uF  [C0805]  88.54 51.2 0 top
C510  100nF  [C0201]  98.5 43.96 270 bottom
C511  100nF  [C0201]  89.41 72.19 180 top
C512  10uF  [C0805]  90.03 35.81 180 top
C513  10uF  [C0805]  90.42 23.19 180 top
C514  47uF  [C1206]  91.18 20.95 180 top
C515  47uF  [C1206]  91.87 37.96 180 top
C516  10uF  [C0805]  92.1 63.82 180 top
C517  10uF  [C0805]  92.43 51.2 180 top
C518  47uF  [C1206]  92.89 66.02 180 top
C519  47uF  [C1206]  93.06 49.03 180 top
C520  100nF  [C0201]  95.43 44.19 270 bottom
C521  10uF  [C0805]  95.09 30.46 90 top
C522  100nF  [C0201]  95.12 75.26 90 top
C523  100nF  [C0201]  96.92 69.1 270 top
C524  47uF  [C1206]  97.24 30.86 90 top
C525  10uF  [C0805]  97.28 58.46 90 top
C526  10uF  [C0805]  98.09 70.76 180 top
C527  12pF  [C0402]  98.86 66.1 270 top
C528  47uF  [C1206]  99.64 59.12 90 top
C529  12pF  [C0402]  100.24 62.61 180 top
C530  100nF  [C0201]  100.25 70.5 90 top
C531  220nF  [C0201]  35.58 26.85 0 top
C532  220nF  [C0201]  35.58 26.19 0 top
C533  220nF  [C0201]  39.94 20.23 270 top
C534  220nF  [C0201]  40.65 20.23 270 top
C535  220nF  [C0201]  43.95 20.23 270 top
C536  220nF  [C0201]  44.66 20.23 270 top
C537  220nF  [C0201]  47.2 65.5 90 bottom
C538  220nF  [C0201]  46.52 65.5 90 bottom
C539  10nF  [C0201]  29.12 25.62 90 top
C540  100nF  [C0201]  57.53 25.25 0 top
C541  1uF  [C0402]  60.73 28.27 0 top
C542  100nF  [C0201]  60.7 29.14 0 top
C543  4.7uF  [C0603]  61.54 30.97 0 top
C544  10nF  [C0201]  53.15 28.67 270 top
C545  100nF  [C0201]  91.11 19.16 0 top
C546  4.7uF  [C1210]  95.74 16.11 90 top
C547  100nF  [C0201]  96.54 12.7 0 top
C548  33pF  [C0201]  69.64 16.88 90 bottom
C549  10uF  [C0805]  60.77 21.19 180 bottom
C550  100nF  [C0201]  65.27 21.36 0 bottom
C551  10uF  [C0805]  55.99 21.19 180 bottom
C552  100nF  [C0201]  58.53 21.19 270 bottom
C553  10uF  [C0805]  20.46 20.94 90 bottom
C554  100nF  [C0201]  13.45 19.69 180 bottom
C555  10uF  [C0805]  9.26 21.29 270 top
C556  100nF  [C0201]  10.75 23.76 90 top
C557  1nF  [C1206]  65.39 3.08 90 bottom
D1  TPD1E1B04DPYR  [D0402]  98.04 35.39 270 bottom
D2  TPD1E1B04DPYR  [D0402]  96.84 35.39 270 bottom
D3  TPD1E1B04DPYR  [D0402]  95.28 20.85 0 bottom
D4  TPD1E1B04DPYR  [D0402]  95.28 19.92 0 bottom
D5  ESD122DMXR  [X2SON3_0D3_0_6X1X0_4MM]  83.47 10.71 90 bottom
D6  TPD1E05U06DPYR  [D0402_1C2A]  62.25 13.67 90 bottom
D7  6.8V  [SOT23]  61.43 67.44 0 bottom
D8  TPD1E05U06DPYR  [D0402_1C2A]  60.77 13.67 90 bottom
D9  TPD1E05U06DPYR  [D0402_1C2A]  59.32 13.67 90 bottom
D10  TPD1E05U06DPYR  [D0402_1C2A]  57.92 13.67 90 bottom
D11  TPD1E05U06DPYR  [D0402_1C2A]  56.65 13.67 90 bottom
D12  TPD1E05U06DPYR  [D0402_1C2A]  55.26 13.67 90 bottom
D13  ESD122DMXR  [X2SON3_0D3_0_6X1X0_4MM]  42.27 16.17 270 bottom
D14  ESD122DMXR  [X2SON3_0D3_0_6X1X0_4MM]  40.26 16.17 270 bottom
D15  ESD122DMXR  [X2SON3_0D3_0_6X1X0_4MM]  38.22 16.17 270 bottom
D16  ESD122DMXR  [X2SON3_0D3_0_6X1X0_4MM]  36.19 16.17 270 bottom
D17  ESD122DMXR  [X2SON3_0D3_0_6X1X0_4MM]  34.15 16.17 270 bottom
D18  ESD122DMXR  [X2SON3_0D3_0_6X1X0_4MM]  32.14 16.17 270 bottom
D19  TPD1E1B04DPYR  [D0402]  29.51 16.35 180 bottom
D20  B130L-13-F  [DO_214AC_SMA]  6.86 24.64 180 top
D21  B130L-13-F  [DO_214AC_SMA]  12.52 21.66 180 bottom
D22  TPD1E1B04DPYR  [D0402]  8.25 51.29 90 top
D23  TPD1E1B04DPYR  [D0402]  18.5 59.02 90 top
D24  TPD1E1B04DPYR  [D0402]  18.98 25.06 90 top
D25  TPD1E1B04DPYR  [D0402]  19.17 63.46 180 top
D26  TPD1E1B04DPYR  [D0402]  19.17 62.45 180 top
D27  TPD1E1B04DPYR  [D0402]  19.17 61.3 180 top
D28  TPD1E1B04DPYR  [D0402]  19.17 56.88 180 top
D29  TPD1E1B04DPYR  [D0402]  19.17 55.85 180 top
D30  TPD1E1B04DPYR  [D0402]  19.84 29.52 180 top
D31  TPD1E1B04DPYR  [D0402]  21.45 26.5 0 top
D32  TPD1E1B04DPYR  [D0402]  21.46 25.48 0 top
D33  TPD1E1B04DPYR  [D0402]  23.02 31.93 180 top
D34  TPD1E1B04DPYR  [D0402]  25.69 26.5 0 top
D35  TPD1E1B04DPYR  [D0402]  26.6 30.97 90 top
D36  TPD1E05U06DPYR  [D0402_1C2A]  55.75 11.6 90 top
D37  TPD1E05U06DPYR  [D0402_1C2A]  57.01 11.6 90 top
D38  TPD1E05U06DPYR  [D0402_1C2A]  58.67 11.6 90 top
D39  TPD1E05U06DPYR  [D0402_1C2A]  59.94 11.6 90 top
D40  ESD122DMXR  [X2SON3_0D3_0_6X1X0_4MM]  66.22 24.23 0 top
D41  PMEG3010CEJ  [SOD_323]  66.37 21.48 0 top
D42  ESD122DMXR  [X2SON3_0D3_0_6X1X0_4MM]  99.3 76.73 90 top
D43  ESD122DMXR  [X2SON3_0D3_0_6X1X0_4MM]  83.55 9.82 90 top
D44  ESD122DMXR  [X2SON3_0D3_0_6X1X0_4MM]  87.82 9.82 90 top
D45  ESD122DMXR  [X2SON3_0D3_0_6X1X0_4MM]  87.6 10.71 90 bottom
D46  ESD122DMXR  [X2SON3_0D3_0_6X1X0_4MM]  85.44 10.71 90 bottom
D47  ESD122DMXR  [X2SON3_0D3_0_6X1X0_4MM]  93.7 10.21 0 top
D48  TPD1E1B04DPYR  [D0402]  9.17 16.82 180 top
D49  TPD1E1B04DPYR  [D0402]  9.17 15.85 180 top
D50  PMEG3010CEJ  [SOD_323]  98.07 49.78 0 bottom
D51  PMEG3010CEJ  [SOD_323]  98.07 51.22 0 bottom
D52  TPD1E1B04DPYR  [D0402]  9.95 65.68 270 bottom
FL1  120R  [L0603]  83.49 55.72 180 bottom
FL2  120R  [L0603]  68.18 59.5 90 bottom
FL3  120R  [L0603]  55.97 68.21 180 bottom
FL4  120R  [L0603]  53.93 33.08 90 bottom
FL5  120R  [L0603]  47.74 33.7 180 bottom
FL6  120R  [L0603]  44.27 34.44 90 bottom
FL7  120R  [L0603]  40.87 34.41 90 bottom
FL8  120R  [L0603]  10.88 34.24 270 top
FL9  120R  [L0603]  60.11 26.22 90 top
FL10  120R  [L0603]  23.88 28.35 90 top
FL11  120R  [L0603]  61.55 26.22 90 top
FL12  120R  [L0603]  29.27 28.4 90 top
FL13  120R  [L0603]  34.55 34.75 180 top
FL14  120R  [L0603]  34.98 67.82 0 top
FL15  120R  [L0603]  37.76 34.89 0 top
FL16  120R  [L0603]  40.87 34.41 90 top
FL17  120R  [L0603]  41.22 71.89 0 top
FL18  120R  [L0603]  44.27 34.44 90 top
FL19  120R  [L0603]  46.18 69.66 0 top
FL20  120R  [L0603]  47.74 33.7 180 top
FL21  120R  [L0603]  49.22 69.66 0 top
FL22  120R  [L0603]  53.38 30.81 0 top
FL23  120R  [L0603]  53.39 33.35 180 top
FL24  120R  [L0603]  54.22 23.91 180 top
FL25  120R  [L0603]  56.03 33.06 90 top
FL26  120R  [L0603]  60.66 61.42 90 top
J1  Header 4P 1.25MM  [HEADER4_2P_1D25_SMD_10X5_3X3_6MM]  7 17.06 270 top
J2  B3B-ZR(LF)(SN)  [CON3B35X60]  100.56 25.15 90 bottom
J3  B3B-ZR(LF)(SN)  [CON3B35X60]  100.56 17.64 90 bottom
J4  AS0BC27-S40BE-7H  [CON_MINIPEX_067_SMT_RA_M2_KEYE_C]  90.81 73.77 180 bottom
J5  UBF31-2347-1  [USB_MTCONN_UBF31-2347-1]  85.75 8.72 180 bottom
J6  DC630-20D01  [CONN3-PWR-DC630]  74.19 11.19 270 bottom
J7  3VM11201-D730-7H  [DP20_0D6_9_8X11_8X5_9MM]  58.66 4.69 180 bottom
J8  UAA111C-84161-4H  [USB3_1_2D0_17_5X13_6X15_69MM]  37.15 7.12 180 bottom
J9  LPJG0933HENL  [RJ45_18P_LPJG0801HBNL]  18.25 8.23 180 bottom
J10  Header 2x8 1.27mm  [HEADER2X8_SMD_1D27]  4.79 15.88 270 bottom
J11  TC2050-IDC  [CONNECT10_1D27_12_4X6_7MM]  3.91 45.97 270 top
J12  YL004-030-001  [MICRO_SD_15X14_3X1_8MM]  15.89 54.72 90 top
J13  FPC 22P 0.5mm  [FPC22_0D5_15_4X5_25X2MM_0D5_DX_NPWB]  27.55 74.31 180 top
J15  FPC 22P 0.5mm  [FPC22_0D5_15_4X5_25X2MM_0D5_DX_NPWB]  52.26 74.31 180 top
J16  FPC 22P 0.5mm  [FPC22_0D5_15_4X5_25X2MM_0D5_DX_NPWB]  84.72 74.31 180 top
L1  90R  [L2012]  84.59 12.98 270 bottom
L2  1.8uH  [L7572_XAL7070]  74.41 18.32 270 bottom
L3  90R  [L2012]  61.47 16.37 270 bottom
L4  90R  [L2012]  58.64 16.37 270 bottom
L5  90R  [L2012]  55.96 16.37 270 bottom
L6  90R  [L2012]  42.27 18.7 270 bottom
L7  90R  [L2012]  40.3 18.7 270 bottom
L8  90R  [L2012]  38.2 18.7 270 bottom
L9  90R  [L2012]  36.17 18.7 270 bottom
L10  90R  [L2012]  34.16 18.7 270 bottom
L11  90R  [L2012]  32.13 18.7 270 bottom
L12  90R  [L2012]  56.39 13.91 270 top
L13  90R  [L2012]  59.32 15.19 270 top
L14  90R  [L2012]  63.84 24.22 0 top
L15  0.47uH  [L4242]  80.44 43.86 90 top
L16  0.47uH  [L1008]  81.98 36.84 90 top
L17  0.47uH  [L1008]  82.04 21.95 270 top
L18  0.47uH  [L1008]  83.79 64.84 90 top
L19  0.47uH  [L1008]  83.82 49.96 270 top
L20  0.47uH  [L1008]  95.96 22.02 270 top
L21  0.47uH  [L1008]  95.97 36.84 90 top
L22  0.47uH  [L1008]  96.21 26.92 0 top
L23  0.47uH  [L1008]  96.84 64.89 90 top
L24  0.47uH  [L1008]  97 49.99 270 top
L25  0.47uH  [L1008]  98.49 55.17 0 top
L26  90R  [L2012]  99.32 74.15 90 top
L27  90R  [L2012]  89.7 11.21 180 top
L28  90R  [L2012]  89.81 11.17 180 bottom
L29  90R  [L2012]  85.13 11.21 180 top
L30  90R  [L2012]  82.45 12.95 270 bottom
LED1  Green  [LED0603]  100.38 37.84 180 bottom
LED2  Green  [LED0603]  100.38 36.19 180 bottom
LED3  Green  [LED0603]  100.38 34.59 180 bottom
LED4  Green  [LED0603]  100.38 32.99 180 bottom
LED5  Green  [LED0603]  100.38 31.39 180 bottom
LED6  Green  [LED0603]  100.38 29.83 180 bottom
MH1  Hole 3.175MM  [MTGH200C125D_PL]  2.84 77.25 180 bottom
MH2  Hole 3.175MM  [MTGH200C125D_PL]  2.99 35.93 180 bottom
MH3  Hole 3.175MM  [MTGH200C125D_PL]  3.96 3.61 180 bottom
MH4  SMSR3066MTJ  [PTH_4_45MM_6D5]  6.24 72.17 180 bottom
MH5  SMSR3066MTJ  [PTH_4_45MM_6D5]  6.24 30.26 180 bottom
MH6  SMSR3066MTJ  [PTH_4_45MM_6D5]  72.28 75.35 180 bottom
MH7  SMSR3066MTJ  [PTH_4_45MM_6D5]  77.36 27.09 180 bottom
MH8  2E0BC21-A40TP-7H  [PTH_4_2MM_5D8]  90.81 43.89 180 bottom
MH9  Hole 3.175MM  [MTGH200C125D_PL]  98.68 3.61 180 bottom
NOREF  -  []  47.11 -95.07 0 top
NOREF#2  -  []  -158.43 -74.49 0 top
NOREF#3  -  []  -539.58 -94.51 0 top
P8  Header 2x23 2.54mm  [HEADER2X23P_2D54_SMD_PTH]  39.26 75.35 180 bottom
P9  Header 2x25 2.54mm  [HEADER2X25P_2D54_SMD_PTH]  41.8 27.09 180 bottom
Q1  IRLML6402TRPBF  [SOT23]  11.08 60.6 0 bottom
Q2  CSD17575Q3  [VSON8_0D65_3_3X3_3X1MM]  71.19 21.27 90 top
Q3  CSD17308Q3  [VSON8_0D65_3_3X3_3X1MM]  75.02 21.24 270 top
Q4  BSS138W  [SOT-323-3]  97.42 73.23 0 top
Q5  BSS138W  [SOT-323-3]  4.67 9.49 0 top
Q6  BSS138W  [SOT-323-3]  2.41 9.49 0 top
R1  0R  [R0201]  95.48 46.71 180 top
R2  26.1K  [R0201]  97.33 60.95 270 bottom
R3  21K  [R0201]  96.62 60.95 270 bottom
R4  0R  [R0201]  95.91 60.95 270 bottom
R5  10K  [R0201]  95.04 67.91 90 bottom
R6  4.7K  [R0402]  93.98 60.7 0 bottom
R7  0R  [R0201]  92.93 61.55 180 bottom
R8  1K  [R0402]  92.79 33.54 180 bottom
R9  0R  [R1206]  92.39 3.6 90 bottom
R10  10K  [R0201]  92.21 28.67 270 bottom
R11  10K  [R0201]  92.18 32.24 270 bottom
R12  0R  [R0201]  96.37 12.84 0 bottom
R13  10K  [R0201]  90.38 61.32 270 bottom
R14  4.7K  [R0402]  96.67 11.93 0 bottom
R15  0R  [R0201]  89.61 61.34 270 bottom
R16  20K  [R0402]  88.8 18.08 90 bottom
R17  4.7K  [R0402]  96.67 10.66 0 bottom
R18  10K  [R0201]  88.32 33.3 270 bottom
R19  10K  [R0201]  88.19 67.91 270 bottom
R20  2.2K  [R0201]  87.63 61.91 0 bottom
R21  10K  [R0201]  87.86 18.42 270 bottom
R22  4.7K  [R0402]  96.67 9.64 0 bottom
R23  0R  [R0201]  87.55 33.28 270 bottom
R24  10K  [R0201]  87.48 67.91 270 bottom
R25  5.1K  [R0402]  93.67 11.45 180 top
R26  0R  [R0201]  87.19 18.42 90 bottom
R27  10K  [R0201]  86.77 67.91 90 bottom
R28  10K  [R0201]  86.06 67.91 90 bottom
R29  0R  [R0406]  85.34 63.44 180 bottom
R30  5.1K  [R0402]  93.71 8.91 180 top
R31  0R  [R0406]  83.01 53.53 180 bottom
R32  0R  [R0406]  82.52 23.59 270 bottom
R33  0R  [R0406]  80.47 32.15 90 bottom
R34  0R  [R0406]  80.45 47.78 90 bottom
R35  0.005R  [R1206]  79.98 16.35 90 bottom
R36  10K  [R0201]  78.28 59.03 180 bottom
R37  100R  [R0201]  77.8 73.91 90 bottom
R38  10K  [R0201]  77.35 43.18 90 bottom
R39  10K  [R0201]  74.93 52.12 270 bottom
R40  10K  [R0201]  71.46 67.89 90 bottom
R41  33R  [R0201]  71.46 66.29 90 bottom
R42  240R  [R0201]  71.27 40.05 90 bottom
R43  240R  [R0201]  70.13 40.05 90 bottom
R44  10K  [R0201]  69.57 57.2 180 bottom
R45  2.05K  [R0201]  68.66 13.66 270 bottom
R46  0R  [R0201]  66.75 57.98 0 bottom
R47  10K  [R0201]  66.23 11.49 0 bottom
R48  0R  [R0201]  65.17 59.4 0 bottom
R49  0R  [R0201]  65.17 57.95 0 bottom
R50  2.2K  [R0201]  65.15 62.58 180 bottom
R51  2.2K  [R0201]  65.15 61.82 180 bottom
R52  2.2K  [R0201]  65.15 60.75 180 bottom
R53  0R  [R0201]  65.15 60.09 0 bottom
R54  2.2K  [R0201]  65.15 58.72 180 bottom
R55  0R  [R0201]  64.84 66.62 90 bottom
R56  10K  [R0201]  64.82 12.58 90 bottom
R57  0R  [R0201]  63.8 36.16 270 bottom
R58  3.4K  [R0201]  63.68 66.67 90 bottom
R59  44.2K  [R0402]  63.13 17.92 270 bottom
R60  0R  [R0201]  63.11 20.06 180 bottom
R61  0R  [R0201]  63.11 19.31 180 bottom
R62  0R  [R0201]  62.89 36.16 270 bottom
R63  2.2K  [R0201]  62.87 62.02 180 bottom
R64  2.2K  [R0201]  62.87 61.21 180 bottom
R65  10K  [R0201]  62.87 62.76 180 bottom
R66  10K  [R0201]  62.05 51.03 90 bottom
R67  0R  [R0201]  61.81 62.46 90 bottom
R68  10K  [R0201]  61.52 36.16 270 bottom
R69  0R  [R0201]  60.75 36.16 270 bottom
R70  10K  [R0201]  59.94 61.92 90 bottom
R71  9.09K  [R0402]  59.94 60.11 270 bottom
R72  0R  [R0201]  59.89 36.16 270 bottom
R73  0R  [R0201]  59.18 36.16 270 bottom
R74  16.5K  [R0201]  58.58 66.47 90 bottom
R75  2.2K  [R0201]  58.17 64.78 180 bottom
R76  2.2K  [R0201]  58.17 64.11 180 bottom
R77  0R  [R0201]  57.86 60.39 0 bottom
R78  0R  [R0201]  57.86 59.25 0 bottom
R79  10K  [R0201]  57.85 66.47 90 bottom
R80  10R  [R0402]  54.98 62.27 90 bottom
R81  499R  [R0402]  54.97 60.09 90 bottom
R82  200K  [R0402]  99.49 8.5 180 top
R83  240R  [R0201]  53.24 46.48 315 bottom
R84  10K  [R0201]  53.14 12.21 180 bottom
R85  100K  [R0402]  51.63 17.67 180 bottom
R86  20K  [R0402]  51.43 12.18 0 bottom
R87  10K  [R0201]  49.66 53.57 90 bottom
R88  3.01K  [R0402]  48.41 61.26 0 bottom
R89  3.01K  [R0402]  47.65 45.26 0 bottom
R90  499R  [R0402]  46.84 60.88 135 bottom
R91  49.9R  [R0201]  44.87 68.27 90 bottom
R92  499R  [R0402]  44.86 44.88 270 bottom
R93  0R  [R0201]  44.68 67.04 90 bottom
R94  3.01K  [R0402]  44.48 61.26 0 bottom
R95  0R  [R0201]  43.92 67.04 90 bottom
R96  49.9R  [R0201]  43.68 68.27 90 bottom
R97  3.01K  [R0402]  43.44 60.07 270 bottom
R98  499R  [R0402]  42.34 45.69 90 bottom
R99  499R  [R0402]  41.22 44.89 315 bottom
R100  3.01K  [R0402]  38.84 61.26 180 bottom
R101  0R  [R0201]  33.09 67.84 90 bottom
R102  2.2K  [R0201]  31.57 38.15 270 bottom
R103  0R  [R0201]  31.34 67.83 90 bottom
R104  0R  [R0201]  30.89 38.15 270 bottom
R105  0R  [R0201]  30.55 66.49 90 bottom
R106  10K  [R0201]  30.15 38.15 90 bottom
R107  10K  [R0201]  29.48 38.15 90 bottom
R108  0R  [R0201]  29.11 66.41 180 bottom
R109  0R  [R0201]  29.08 67.28 180 bottom
R110  10K  [R0201]  29.06 42.03 180 bottom
R111  2.2K  [R0201]  29.04 45.56 0 bottom
R112  10K  [R0201]  29.04 44.91 0 bottom
R113  10K  [R0201]  29.04 44.19 180 bottom
R114  10K  [R0201]  29.04 43.51 180 bottom
R115  10K  [R0201]  29.04 42.83 0 bottom
R116  10K  [R0201]  29.02 48.35 180 bottom
R117  10K  [R0201]  29.01 49.02 180 bottom
R118  10K  [R0201]  28.83 57.51 0 bottom
R119  10K  [R0201]  28.83 56.81 180 bottom
R120  10K  [R0201]  28.73 38.15 270 bottom
R121  10K  [R0201]  27.96 38.15 90 bottom
R122  33R  [R0201]  27.48 50.93 180 bottom
R123  10K  [R0201]  27.47 65.61 180 bottom
R124  10K  [R0201]  27.45 48.35 0 bottom
R125  10K  [R0201]  27.43 49.04 180 bottom
R126  10K  [R0201]  27.2 38.15 270 bottom
R127  0R  [R0201]  26.55 45.13 180 bottom
R128  0R  [R0201]  26.16 61.87 180 bottom
R129  0R  [R0201]  26.16 60.27 180 bottom
R130  0R  [R0201]  26.13 62.91 180 bottom
R131  0R  [R0201]  26.11 64.76 180 bottom
R132  0R  [R0201]  26.11 63.82 180 bottom
R133  10K  [R0201]  26.1 65.62 0 bottom
R134  2.2K  [R0201]  25.75 49.84 0 bottom
R135  10K  [R0201]  25.46 54.71 180 bottom
R136  10K  [R0201]  25.45 55.43 0 bottom
R137  10K  [R0201]  24.7 46.7 0 bottom
R138  10K  [R0201]  24.7 47.39 180 bottom
R139  10K  [R0201]  22.39 48.01 0 bottom
R140  10K  [R0201]  22.38 48.66 180 bottom
R141  3K  [R0402]  22.07 46.66 180 bottom
R142  11K  [R0402]  22.07 45.34 0 bottom
R143  10K  [R0201]  21.74 43.77 0 bottom
R144  10K  [R0201]  21.72 44.45 180 bottom
R145  10K  [R0201]  19.88 49.81 180 bottom
R146  10K  [R0201]  19.88 49.1 180 bottom
R147  2.2K  [R0201]  18.65 51.21 180 bottom
R148  10K  [R0201]  18.64 49.81 0 bottom
R149  10K  [R0201]  18.64 49.13 0 bottom
R150  0R  [R0201]  18.01 55.95 180 bottom
R151  0R  [R0201]  18.01 54.63 180 bottom
R152  10K  [R0201]  15.99 64.29 270 bottom
R153  10K  [R0201]  15.32 64.29 270 bottom
R154  11K  [R0402]  14.43 32.58 0 bottom
R155  10K  [R0201]  12.03 50.03 180 bottom
R156  10K  [R0201]  12.03 50.93 180 bottom
R157  1K  [R0402]  11.13 63.14 0 bottom
R158  0R  [R0201]  20.34 8.4 270 top
R159  4.7K  [R0402]  9.45 53.04 90 bottom
R160  4.7K  [R0402]  8.44 53.03 270 bottom
R161  10K  [R0201]  8.25 49.7 90 top
R162  10K  [R0201]  8.29 44.94 90 top
R163  10K  [R0201]  29.99 19.09 90 top
R164  1.69K  [R0402]  28.17 25.98 90 top
R165  4.7K  [R0402]  8.66 42.51 180 top
R166  3.57K  [R0402]  27.2 25.98 270 top
R167  5.76K  [R0402]  13.34 41.45 0 top
R168  2.49K  [R0402]  13.34 40.43 180 top
R169  10K  [R0201]  13.48 48.09 180 top
R170  5.76K  [R0402]  13.73 43.02 270 top
R171  10K  [R0201]  13.87 45.66 0 top
R172  0R  [R0201]  13.92 46.55 180 top
R173  10K  [R0201]  14.71 48.09 0 top
R174  0R  [R0201]  14.77 30.33 270 top
R175  2.49K  [R0402]  14.78 43.02 90 top
R176  0R  [R0201]  14.78 49.72 0 top
R177  10K  [R0201]  16.28 48.09 180 top
R178  10K  [R0201]  16.28 47.4 180 top
R179  5.76K  [R0402]  16.36 43.58 180 top
R180  2.49K  [R0402]  16.36 42.55 0 top
R181  2.2K  [R0201]  16.47 41.11 270 top
R182  10K  [R0201]  17.22 41.11 270 top
R183  470R  [R0402]  17.37 8.47 90 top
R184  5.76K  [R0402]  18.3 43.58 0 top
R185  2.49K  [R0402]  18.3 42.55 180 top
R186  470R  [R0402]  18.44 8.47 90 top
R187  10K  [R0201]  18.63 47.89 270 top
R188  47K  [R0201]  19.17 57.75 180 top
R189  47K  [R0201]  19.17 54.98 180 top
R190  33R  [R0201]  19.17 54.29 180 top
R191  470R  [R0402]  19.5 8.47 90 top
R192  1K  [R0402]  19.51 45.79 90 top
R193  10K  [R0201]  19.63 48.19 0 top
R194  0R  [R0201]  19.64 47.4 180 top
R195  2.49K  [R0402]  19.74 41.11 90 top
R196  5.76K  [R0402]  20.19 43.58 180 top
R197  2.49K  [R0402]  20.19 42.55 0 top
R198  33R  [R0201]  20.45 57.74 180 top
R199  2.2K  [R0201]  20.62 45.14 180 top
R200  0R  [R0201]  20.66 46.51 180 top
R201  47K  [R0201]  20.7 63.43 180 top
R202  47K  [R0201]  20.7 62.46 180 top
R203  47K  [R0201]  20.73 61.41 180 top
R204  5.76K  [R0402]  20.73 41.11 270 top
R205  33R  [R0201]  21.65 41.11 270 top
R206  0R  [R0201]  21.74 57.73 180 top
R207  33R  [R0201]  21.89 63.43 180 top
R208  33R  [R0201]  21.89 62.47 180 top
R209  2.2K  [R0201]  21.92 43.65 0 top
R210  2.2K  [R0201]  21.93 42.9 180 top
R211  0R  [R0201]  21.93 42.24 180 top
R212  33R  [R0201]  22.74 39.21 180 top
R213  33R  [R0201]  22.74 38.44 180 top
R214  33R  [R0201]  22.74 37.67 180 top
R215  33R  [R0201]  22.74 36.99 180 top
R216  33R  [R0201]  22.74 36.28 180 top
R217  0R  [R0201]  23.37 48.18 180 top
R218  10K  [R0201]  23.49 61.02 180 top
R219  0R  [R0201]  23.49 53.05 180 top
R220  0R  [R0201]  23.49 60.29 180 top
R221  0R  [R0201]  23.49 59.45 180 top
R222  0R  [R0201]  23.51 63.45 180 top
R223  0R  [R0201]  23.51 62.48 180 top
R224  0R  [R0201]  23.51 61.75 180 top
R225  33R  [R0201]  24.28 36.66 270 top
R226  0R  [R0201]  24.41 49.6 90 top
R227  0R  [R0201]  24.45 53.73 90 top
R228  10K  [R0201]  9.83 40.9 180 bottom
R229  10K  [R0201]  12.06 46.37 180 bottom
R230  33R  [R0201]  24.99 36.66 270 top
R231  10K  [R0201]  25.31 61.26 0 top
R232  10K  [R0201]  25.32 59.45 180 top
R233  10K  [R0201]  25.32 58.71 0 top
R234  0R  [R0201]  25.33 60.2 180 top
R235  2.2K  [R0201]  25.33 57.45 0 top
R236  2.2K  [R0201]  25.33 56.74 0 top
R237  33R  [R0201]  25.69 36.66 270 top
R238  10K  [R0201]  25.71 50.8 180 top
R239  0R  [R0201]  25.71 48.7 180 top
R240  0R  [R0201]  25.71 47.93 180 top
R241  10K  [R0201]  25.72 50.08 0 top
R242  0R  [R0201]  25.73 49.39 180 top
R243  10K  [R0201]  29.11 19.09 90 top
R244  10K  [R0201]  60.7 29.89 180 top
R245  0R  [R0201]  26.15 42.9 180 top
R246  10K  [R0201]  26.17 43.63 0 top
R247  10K  [R0201]  26.2 44.42 180 top
R248  33R  [R0201]  26.42 36.66 270 top
R249  33R  [R0201]  27.14 36.66 270 top
R250  0R  [R0201]  27.32 55.7 180 top
R251  0R  [R0201]  27.33 62.53 180 top
R252  0R  [R0201]  27.34 61.29 180 top
R253  0R  [R0201]  27.34 60.62 180 top
R254  0R  [R0201]  27.34 58.6 180 top
R255  0R  [R0201]  27.34 57.84 180 top
R256  0R  [R0201]  27.34 57.08 180 top
R257  0R  [R0201]  27.34 63.45 180 top
R258  10K  [R0201]  27.35 59.94 0 top
R259  10K  [R0201]  27.35 59.28 180 top
R260  0R  [R0201]  27.44 43.64 180 top
R261  10K  [R0201]  27.45 42.92 180 top
R262  10K  [R0201]  27.45 51.79 180 top
R263  10K  [R0201]  27.45 51.11 180 top
R264  0R  [R0201]  27.45 49.8 180 top
R265  10K  [R0201]  27.45 47.6 180 top
R266  10K  [R0201]  27.46 50.46 180 top
R267  10K  [R0201]  27.46 46.27 180 top
R268  10K  [R0201]  27.46 45.61 180 top
R269  10K  [R0201]  27.46 49.03 180 top
R270  10K  [R0201]  27.46 48.31 0 top
R271  10K  [R0201]  27.46 46.92 180 top
R272  10K  [R0201]  27.46 44.41 0 top
R273  10K  [R0201]  27.46 52.43 0 top
R274  33R  [R0201]  27.72 53.35 90 top
R275  33R  [R0201]  27.83 36.66 270 top
